# Altium PCB PCB1.PcbDoc (part 2 of 3)
Units mil, origin at the board's own origin, x right, y up, seen from the top; angles counter-clockwise.
Board outline 3150 x 1810 mil, 2 copper layers (Top Layer, Bottom Layer); 127 components, 76 nets, 410 pads, 265 vias.
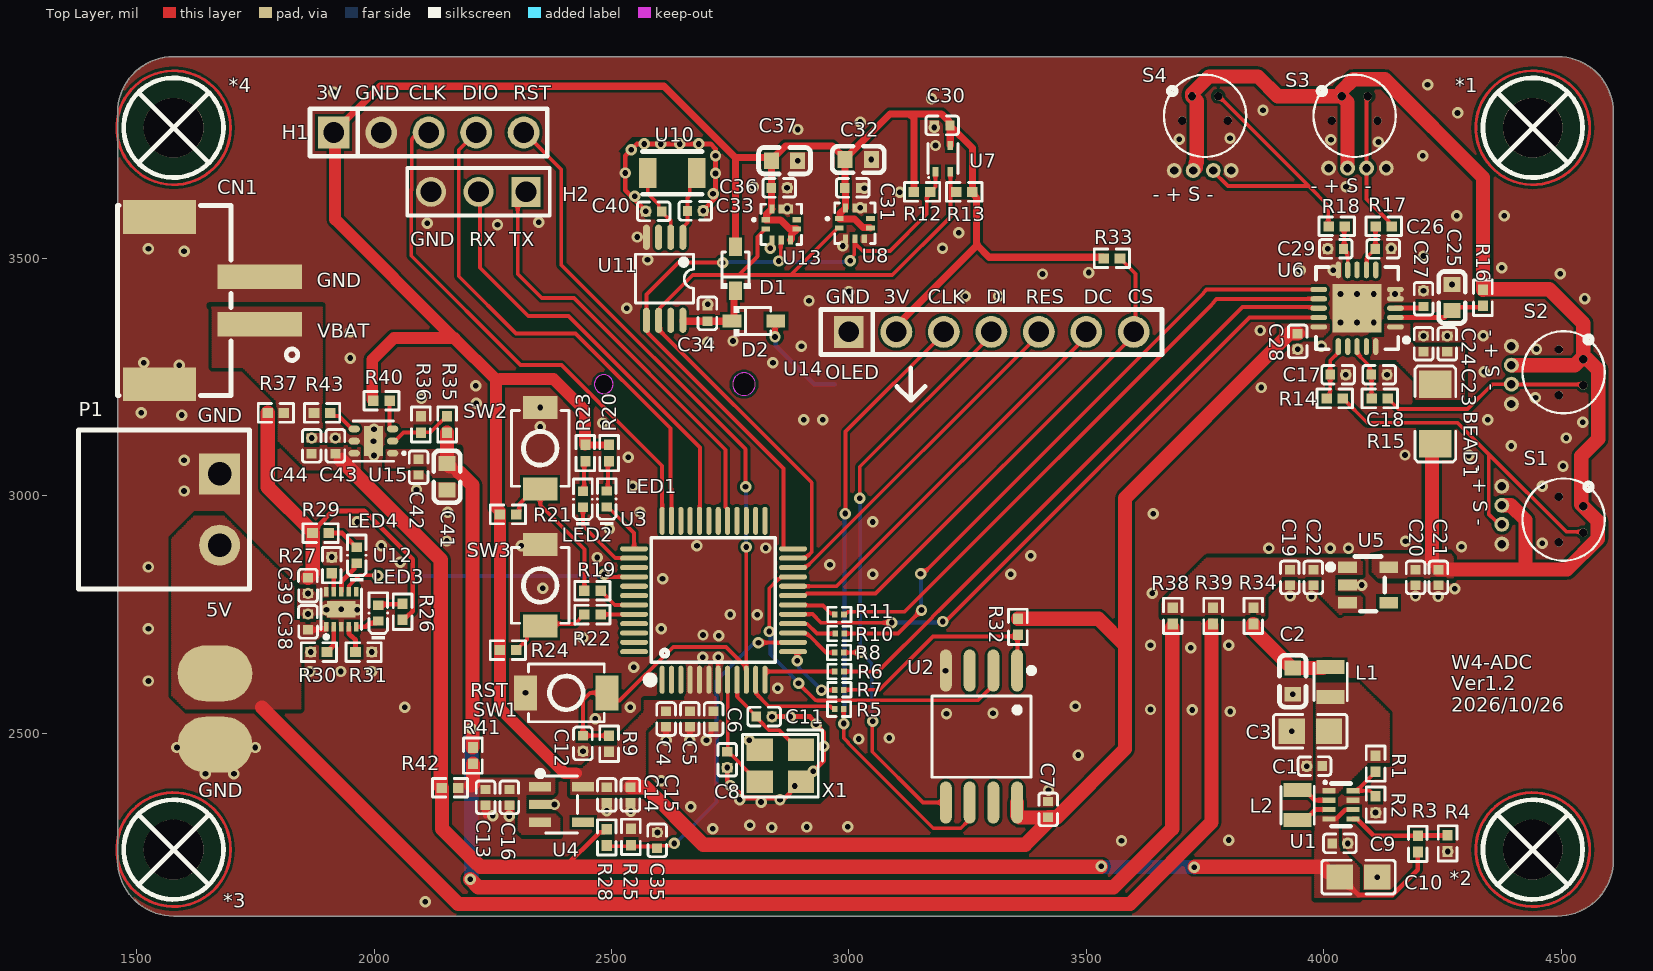
[diagram p0: Top Layer view]

## Part data (continued)
U10: "晶振类型:贴片晶振;频率:32.768kHz;常温频差:±10ppm;负载电容:12.5pF;频率稳定度:±10ppm;", Equivalent Series Resistance(ESR)=70kΩ, Frequency Stability=±10ppm, JLCPCB Part Class="Extended Part", LCSC Part Name="3215 2P 32.768kHz 12.5pF ±10ppm -40~+85℃(±10ppm)", Load Capacitance=12.5pF, Manufacturer=HCI(杭晶), ManufacturerPart=FC31M2-32.768-NTLNNDTL, Operating Temperature=-40℃~+85℃, AddInBom=yes, ConvertToPcb=yes, Datasheet=https://item.szlcsc.com/datasheet/FC31M2-32.768-NTLNNDTL/5705379.html, FootprintName=CRYSTAL-SMD_L3.2-W1.5, ModelId=762d7afc596f4558a373612390f4386d, ModelName=CRYSTAL-SMD_L3.2-W1.5-1, ModelTransform=125.984,59.055,0,0,0,0,0,0,0, Normal temperature Frequency Tolerance=±10ppm, Supplier=LCSC, Supplier Footprint=SMD3215-2P, SupplierPart=C5120559, Symbol=FC31M2-32.768-NTLNNDTL, Type=贴片晶振
U11: "接口类型:I2C;晶振类型:外置;闹钟输出:有;", Current - Supply=250nA, JLCPCB Part Class="Extended Part", LCSC Part Name=实时时钟/日历, Manufacturer=NXP(恩智浦), ManufacturerPart=PCF8563TS/5,118, Operating Temperature=-40℃~+85℃, Quiescent Current(Iq)=0.25uA, Voltage - Supply=1.8V~5.5V, AddInBom=yes, Alarm Output=有, ConvertToPcb=yes, crystal oscillator=外置, Datasheet=https://www.nxp.com.cn/docs/zh/data-sheet/PCF8563.pdf, Features=看门狗定时器；倒数计时器；告警功能；可编程时钟输出, FootprintName=TSSOP-8_L3.0-W3.0-P0.65-LS4.9-BL, Interface=I2C, ModelId=6d0b9b814610470cb34a1acf75d8754c, ModelName=TSSOP-8_L3.0-W3.0-H1.1-LS4.9-P0.65, ModelTransform=118.11,192.913,0,0,0,0,0,-0.0005,0, Supplier=LCSC, Supplier Footprint=TSSOP-8-3mm, SupplierPart=C27397, Symbol=PCF8563TS/5,118
U12: "工作电压:3.5V~28V;最大充电电流:1A;电池类型:锂电池;电池节数:1;", Balance Current=-, Battery Temperature Detection=支持, Charge Current - Max=1A, Charging Saturation Voltage=4.2V, End-Off Voltage=800mV, JLCPCB Part Class="Extended Part", LCSC Part Name=1A单输入单节锂离子和锂聚合物电池充电器, Manufacturer=TI(德州仪器), ManufacturerPart=BQ24040DSQR, Operating Temperature=0℃~+125℃, Supply Current (Iq)=1mA, Voltage - Supply=3.5V~28V, 0V Battery Charge=支持, AddInBom=yes, ConvertToPcb=yes, Datasheet=https://www.ti.com/cn/lit/ds/symlink/bq24040.pdf, Features=过流保护；恒压充电；恒流充电；自动再充电；充电终止；可编程充电电流；过压保护；欠压锁定；涓流充电；短路保护, FootprintName=WSON-10_L2.0-W2.0-P0.40-BL-EP, Interface=-, ModelId=0e1275d2e7d54e69a402a354e9203fe9, ModelName=WSON-10_L2.0-W2.0-H0.8-P0.40, ModelTransform=78.74,79.527,0,0,0,0,0,0,0, Number of Cells=1, Supplier=LCSC, Supplier Footprint=WSON-10-EP(2x2), SupplierPart=C81080, Symbol=BQ24040DSQR, The Chip Type=充电芯片, Type of Battery=锂电池
U14: "插孔结构:1x7P;间距:2.54mm;行距:-;圆孔/方孔:方孔;安装方式:直插;排数:单排;总孔位数:7P;额定电流:3A;额定电压:-;插孔方向:顶部;塑高:8.5mm;工作温度:-40℃~+105℃;", Current Rating=3A, JLCPCB Part Class="Extended Part", LCSC Part Name="间距:2.54mm 1x7P 直插", Manufacturer=kinghelm(金航标), ManufacturerPart=KH-2.54FH-1X7P-H8.5, Operating Temperature=-40℃~+105℃, Voltage Rating (Max)=-, AddInBom=yes, Circular Hole / Square Hole=方孔, ConvertToPcb=yes, Datasheet=https://item.szlcsc.com/datasheet/KH-2.54FH-1X7P-H8.5/3278193.html, FootprintName=HDR-TH_7P-P2.54-V-F, Holes Direction=顶部, Holes Structure=1x7P, Insulation Height=8.5mm, ModelId=4c31987253bc43b9b52c17be2a6d3f91, ModelName=HDR-TH_7P-P2.54-F-LI-1X7P, ModelTransform=715.7466,94.488,0,0,0,0,0,0,-118.11, Mounting Type=直插, Number of Positions=7P, Number of Rows=单排, Pitch=2.54mm, Row Spacing=-, Supplier=LCSC, Supplier Footprint=插件,P=2.54mm, SupplierPart=C2932672, Symbol=KH-2.54FH-1X7P-H8.5
U15: "输出极性:正极;工作电压:18V;输出电压:1.24V~17.66V;输出电流:300mA;电源纹波抑制比(PSRR):75dB@(10Hz);输出类型:可调;", JLCPCB Part Class="Extended Part", LCSC Part Name="1.24V~17.66V 300mA 18V", Manufacturer=TI(德州仪器), ManufacturerPart=TPS7A2501DRVR, Operating Temperature=-40℃~+125℃@(Tj), Output Current=300mA, Output Voltage=1.24V~17.66V, Power Supply Rejection Ratio (PSRR)=75dB@(10Hz), standby current=2uA, Voltage - Supply=18V, Voltage Dropout=340mV@(300mA), AddInBom=yes, ConvertToPcb=yes, Datasheet=https://www.ti.com/cn/lit/ds/symlink/tps7a25.pdf, Features=使能控制；内置软启动；工作状态指示；过流保护；热关断；输入欠压保护, FootprintName=WSON-6_L2.0-W2.0-P0.65-TL-EP, ModelId=521c6d8f59ad4736925338f4a59f8ef4, ModelName=WSON-6_L2.0-W2.0-H0.8-P0.65, ModelTransform=79.527,78.74,0,0,0,0,0,0,0, Noise=300uVrms, Number of Outputs=1, Output Configuration=正极, Output Type=可调, Supplier=LCSC, Supplier Footprint=WSON-6-EP(2x2), SupplierPart=C2864326, Symbol=TPS7A2501DRVR
X1: "晶振类型:贴片晶振;频率:8MHz;常温频差:±10ppm;负载电容:12pF;频率稳定度:±20ppm;", Equivalent Series Resistance(ESR)=180Ω, Frequency Stability=±20ppm, JLCPCB Part Class="Extended Part", LCSC Part Name="YSX321SL 8MHZ 4P 3225 12PF ±10PPM -40~85℃ (±20PPM)", Load Capacitance=12pF, Manufacturer=YXC(扬兴晶振), ManufacturerPart=X32258MOB4SI, Normal temperature Frequency Tolerance=±10ppm, Operating Temperature=-40℃~+85℃, AddInBom=yes, ConvertToPcb=yes, Datasheet=https://item.szlcsc.com/datasheet/X32258MOB4SI/2777872.html, FootprintName=CRYSTAL-SMD_4P-L3.2-W2.5-BL, ModelId=ff2dfd5650294453a14147960efe1838, ModelName=CRYSTAL-SMD_4P-L3.2-W2.5-BL, ModelTransform=125.984,98.425,0,0,0,0,0,0,0, Supplier=LCSC, Supplier Footprint=SMD3225-4P, SupplierPart=C2682775, Symbol=X32258MOB4SI, Type=贴片晶振

## Free pads (board coordinates)
  oval 157.48x118.11 smd: 3(1665,2476) 3(1665,2626)
  round 31.5 hole 17.72: 4(3805,3685) 4(4131.64,3690) 4(4374.81,2898.36) 4(4395,3193.36) 5(3767.3,3684.97) 5(4090,3690) 5(4374.81,2940) 5(4395,3235) 6(3725,3685) 6(4050,3690) 6(4374.81,2980) 6(4395,3275) 7(3685,3685) 7(4010,3690) 7(4374.81,3020) 7(4395,3315)

## Via types
v1: diameter 24, hole 12, Top Layer to Bottom Layer, tented both sides, 265 vias